# Altium PCB AcapulcoPCB.PcbDoc
Units mm, origin at the board's own origin, x right, y up, seen from the top; angles counter-clockwise.
Board outline 51.7 x 26.9 mm, 2 copper layers (Top Layer, Bottom Layer); 12 components, 12 nets, 44 pads, 0 vias.
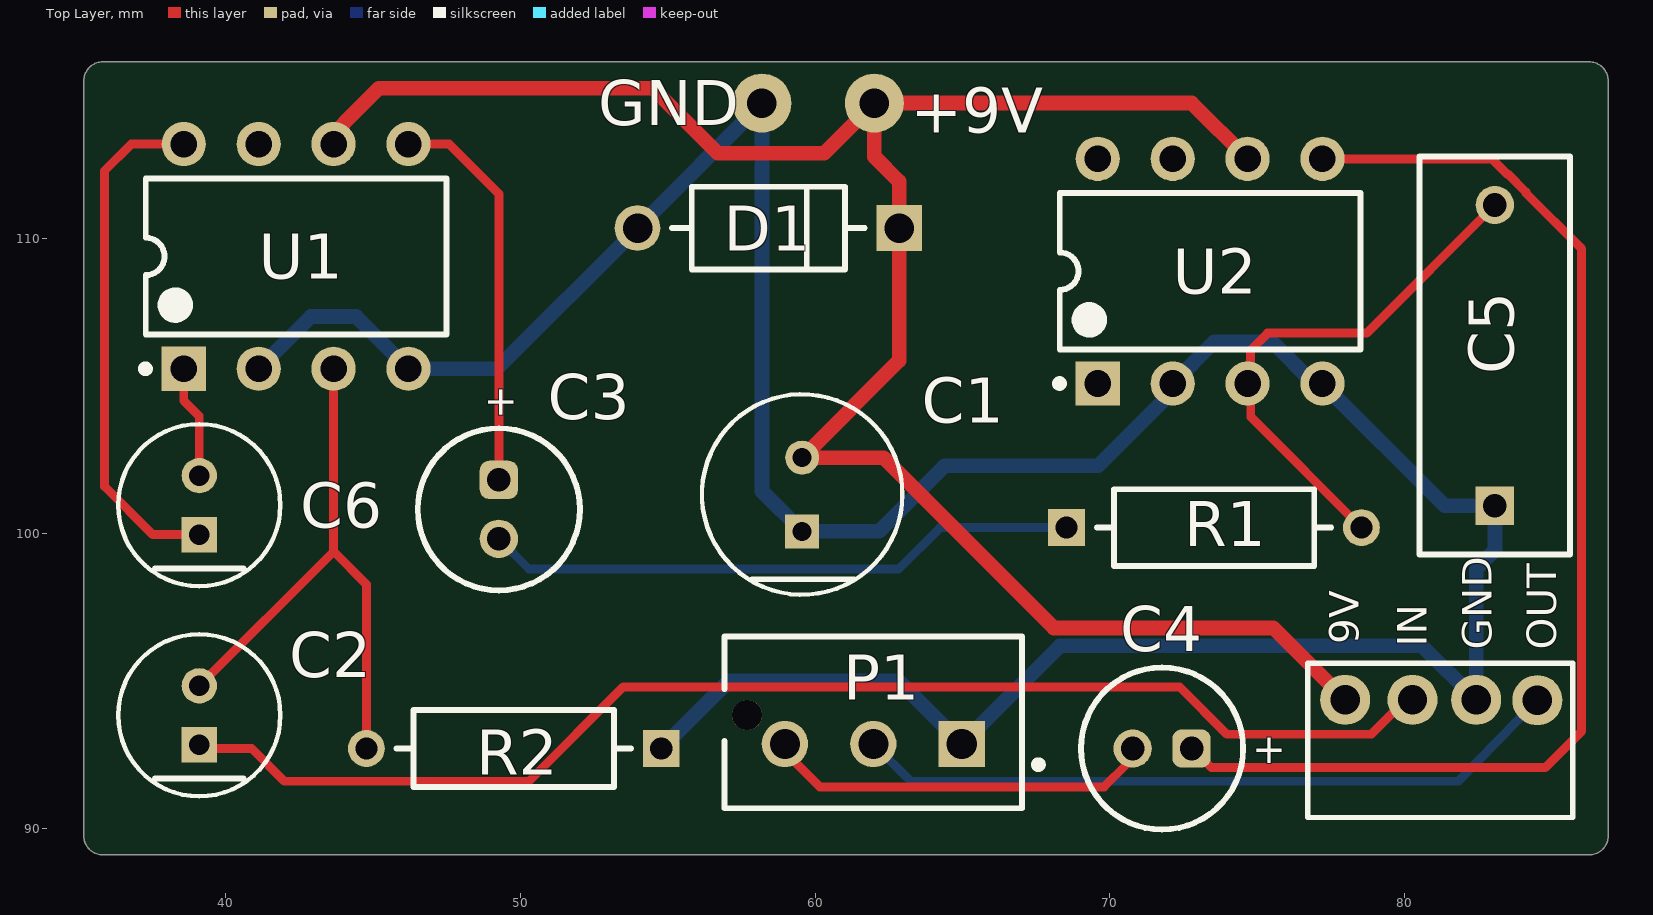
[diagram p0: Top Layer view]
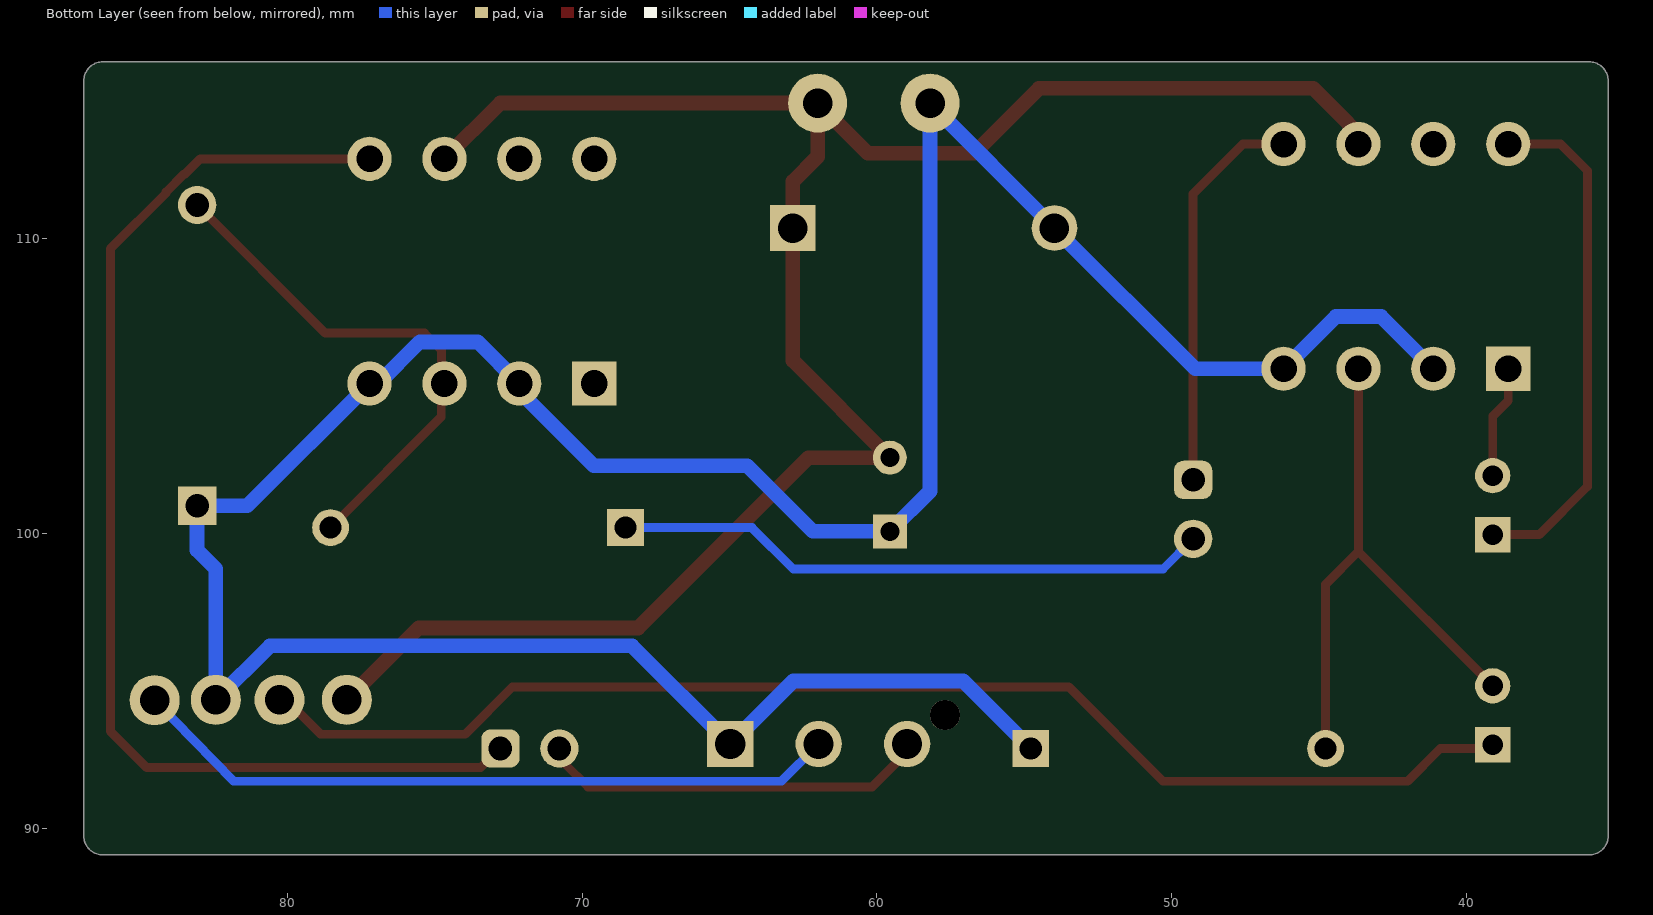
[diagram p1: Bottom Layer view, seen from below]

## Layer stack, top to bottom
Top Solder: solder mask 0.0102, Solder Resist, Dk 3.5
Top Layer: signal copper 0.0356
Dielectric 1: dielectric 0.32, FR-4, Dk 4.5
Bottom Layer: signal copper 0.0356
Bottom Solder: solder mask 0.0102, Solder Resist, Dk 3.5

## Board outline
35.845,89.1 cw(c35.845,89.745) 35.2,89.745 35.2,115.355 cw(c35.845,115.355) 35.845,116 86.255,116 cw(c86.255,115.355) 86.9,115.355 86.9,89.745 cw(c86.255,89.745) 86.255,89.1 83.6,89.1

## Design rules (kind name [scope] priority, off if disabled: settings)
Clearance [All] p1: gap=0.127 ignorepadtopadclearanceinfootprint=FALSE
MinimumSolderMaskSliver [All] p1: minsoldermaskwidth=0.12
PolygonConnect [All] p1: connectstyle=Relief reliefconductorwidth=0.254 reliefentries=4 polygonreliefangle="90 Angle" airgapwidth=0.254
RoutingVias [All] p1: holewidth=0.711 width=1.27 viastyle="Through Hole" minholewidth=0.3 minwidth=0.6 maxholewidth=1 maxwidth=2
SilkToSilkClearance [All] p1: silktosilkclearance=0.13
SolderMaskExpansion [All] p1: expansion=0 istentingtop=FALSE
SupplyNets "Schematic Supply Nets_1" [InNet('GND')] p1: voltage=0.000
SupplyNets "Schematic Supply Nets" [InNet('+9V')] p2: voltage=0.000
Width [All] p1: maxlimit=0.5 minlimit=0.3 preferedwidth=0.3
28 further rules are at their usual default settings.

## Components (designator, comment, footprint, x,y, rotation, side; value= is the part's Value field where it differs from the comment)
C1 "100uF" FP-RAD-TH-D_6_3_0_5-L_7_1-MFG 59.563,101.326 r90 top
C2 "10uF" FP-RAD-TH-D_5_0_5-L_11_1-MFG 39.116,93.837 r90 top
C3 "1uF" WCAP-ATG5_D5H11 -1220.724,1370.822 r90 top
C4 "1uF" WCAP-ATG5_D5H11 1341.771,1362.71 r0 top
C5 "4.7nF" FP-PME271Y447MR30-MFG 83.058,106.045 r90 top
C6 "10uF" FP-RAD-TH-D_5_0_5-L_11_1-MFG 39.116,100.965 r90 top
D1 "1N4007" FP-1N4007-MFG 58.42,110.363 r180 top value=15pF
P1 "100 kΩ logarithmic" FP-216571-3003-MFG 61.976,93.599 r0 top
R1 "68k" FP-CFR-25-MFG 73.533,100.203 r0 top
R2 "1M" FP-CFR-25-MFG 49.784,92.71 r180 top
U1 "LM386N-4/NOPB" P0008A 42.4,109.4 r90 top
U2 "LM386N-4/NOPB" P0008A 73.4,108.9 r90 top

## Footprints (in the part's own frame and the unit in brackets; to place one, negate y for a bottom-side part, rotate by r counter-clockwise, add the part's x,y. Pads: shape width x height; smd on the part's side, far side on the other; paste and mask are expansions set on the pad)
FP-1N4007-MFG [mm]
  rect 1.55x1.55 hole 1 paste-2539.97 mask+0: 1(-4.44,0)
  round 1.55 hole 1 paste-2539.97 mask+0: 2(4.44,0)
  silkscreen extent -3.27,-1.4 3.27,1.4, body extent -5.32,-1.5 5.32,1.5, height 0.25
FP-216571-3003-MFG [mm]
  rect 1.57x1.57 hole 1.02 paste-2539.97 mask+0: 1(3,-0.735)
  round 1.57 hole 1.02 paste-2539.97 mask+0: 2(0,-0.735) 3(-3,-0.735)
  round 1.02 hole 1.02 unplated paste-2539.97 mask+0: ""(-4.28,0.245)
  silkscreen extent -5.05,-2.92 5.72,2.92, body extent -5.15,-3.02 5.15,3.02, height 0.25
FP-CFR-25-MFG [mm]
  rect 1.25x1.25 hole 0.75 paste-2539.97 mask+0: 1(-5,0)
  round 1.25 hole 0.75 paste-2539.97 mask+0: 2(5,0)
  silkscreen extent -3.97,-1.3 3.97,1.3, body extent -5.72,-1.4 5.72,1.4, height 0.25
FP-PME271Y447MR30-MFG [mm]
  rect 1.3x1.3 hole 0.8 paste-2539.97 mask+0: 1(-5.1,0)
  round 1.3 hole 0.8 paste-2539.97 mask+0: 2(5.1,0)
  silkscreen extent -6.75,-2.55 6.75,2.55, body extent -6.85,-2.65 6.85,2.65, height 0.25
FP-RAD-TH-D_5_0_5-L_11_1-MFG [mm]
  rect 1.2x1.2 hole 0.7 paste-2539.97 mask+0: 1(-1,0)
  round 1.2 hole 0.7 paste-2539.97 mask+0: 2(1,0)
  silkscreen extent -2.75,-2.75 2.75,2.75, body extent -2.85,-2.85 2.85,2.85, height 0.25
FP-RAD-TH-D_6_3_0_5-L_7_1-MFG [mm]
  rect 1.15x1.15 hole 0.65 paste-2539.97 mask+0: 1(-1.25,0)
  round 1.15 hole 0.65 paste-2539.97 mask+0: 2(1.25,0)
  silkscreen extent -3.4,-3.4 3.4,3.4, body extent -3.5,-3.5 3.5,3.5, height 0.25
P0008A [mm] "DIP, 8-Leads, Body 10.15x6.6mm, Pitch 2.54mm"
  rect 1.5x1.5 hole 0.9: 1(-3.81,3.81)
  round 1.5 hole 0.9: 2(-3.81,1.27) 3(-3.81,-1.27) 4(-3.81,-3.81) 5(3.81,-3.81) 6(3.81,-1.27) 7(3.81,1.27) 8(3.81,3.81)
  silkscreen extent -3.93,-5.1 2.65,5.23, body extent -3.95,-5.07 3.95,5.07, height 5.08
WCAP-ATG5_D5H11 [mm] "Aluminum Electrolytic Capacitors, 5x11mm"
  rrect50% 1.3x1.3 hole 0.8: 1(-1269,-1270)
  round 1.3 hole 0.8: 2(-1271,-1270)
  silkscreen extent -1272.75,-1272.75 -1267.25,-1267.25, body extent -1272.49,-1272.5 -1267.5,-1267.5, height 11.31

## Part data
C1: library part CMP-05427-001316-1, "Aluminum Electrolytic Capacitors (Radial Lead Type) 100uF ±20% 16V", Case/Package=Radial, Max Operating Temperature=85°C, Min Operating Temperature=-40°C, Package Quantity=2000, Ripple Current=91mA, Tolerance=20%, Voltage=16V, Capacitance=100uF, Diameter=6.3mm, Height=7mm, Height - Seated (Max)=0.315inch, Lead Diameter=0.45mm, Lead Pitch=2.5mm, Length=7mm, Life (Hours)=1000Hour, Mount="Through Hole", Packaging="Tape and Reel", Polarity=Polar, Radiation Hardening=No, RoHS Compliant=Yes, Series=KA, Termination=Radial, Voltage Rating=16V, Voltage Rating (DC)=16V
C2 C6: library part CMP-05427-000651-1, "Aluminum Electrolytic Capacitors (Radial Lead Type) 10uF ±20% 50V", Case/Package=Radial, Max Operating Temperature=105°C, Package Quantity=2000, Ripple Current=250mA, Tolerance=20%, Voltage Rating (DC)=50V, Capacitance=10uF, Diameter=5mm, Dissipation Factor=0.1%, Lead Pitch=2mm, Lead/Base Style=Straight, Length=11mm, Life (Hours)=5000Hour, RoHS Compliant=Yes, Series=FR, Termination=Radial
C3 C4: library part CMP-03913-53914248-2, "Alum. Electrolytic Cap 1UF 63V 5MM Radial WCAP-ATG5 Series Lifetime 2000H +105OC", Capacitance=1µF, Case/Package=Radial, Leakage Current=3µA, Max Operating Temperature=105°C, Min Operating Temperature=-40°C, Ripple Current=13mA, Tolerance=20%, Voltage Rating=63V, Diameter=5mm, Height=11mm, Height - Seated (Max)=12.4968mm, Lead Pitch=2.0066mm, Length=11mm, Life (Hours)=2000hours, Material=Aluminium, Mount="Through Hole", Packaging="Tape & Box (TB)", Pitch=2mm, Polarity=Polar, REACH SVHC=Unknown, RoHS=Compliant, Voltage Rating (DC)=63V
C5: library part CMP-03022-000022-1, "CAP FILM 4700PF 20% 1KVDC RADIAL", Case/Package=Radial, Dielectric Material=Paper, Insulation Resistance=12GR, Max Operating Temperature=100°C, Min Operating Temperature=-40°C, Package Quantity=800, Tolerance=20%, Voltage=250V, Voltage Rating=300V, Voltage Rating (DC)=1kV, Capacitance=4.7nF, Construction=RADIAL, Depth=5.1mm, Height=10.5mm, Height - Seated (Max)=0.413inch, Lead Diameter=0.6mm, Lead Length=30mm, Lead Pitch=10.2mm, Lead/Base Style=Straight, Length=13.5mm, Mount="Through Hole", Number of Pins=2, Packaging=Bulk, Radiation Hardening=No, RoHS Compliant=Yes, Series=PME271Y, Termination=Radial, Voltage Rating (AC)=250V, Weight=0.042329oz, Width=5.1mm
D1: library part CMP-123542-000001-1, "Rectifier diode 1000 V 1 A DO-41, ,", Capacitance=15pF, Forward Current=1A, Manufacturer=Diotec, Max Junction Temp=+175°C, Max Repetitive Reverse Voltage=1000V, Max Surge Forward Current=27A, Peak Reverse Current=5uA, Temperature="-50°C to +175°C", Temperature Range Low=-50°C, Automotive=No, Category=Diode, ComponentLink2Description=Datasheet, ComponentLink2URL=https://datasheet.octopart.com/1N4007-Diotec-datasheet-62346875.pdf, Device Class L1="Discrete Semiconductors", Device Class L2=Diodes, Device Class L3="Rectifier Diodes", Height=2.8mm, Ipc Land Pattern Name=DIOAD888W100L520D280, Lead Free=Yes, Manufacturer Part Number=1N4007, Octopart=https://octopart.com/1n4007-diotec-4040411, Package=1N4007, Reverse Voltage=1000V, RoHS=TRUE, Temperature Range High=+175°C
P1: library part CMP-04776-000396-1, "MICRO-FIT PLUS SR VT HDR ASSY 30"
R1 R2: library part CMP-03413-000009-1, "RES 10 OHM 1/4W 5% AXIAL", Case/Package=Axial, Max Operating Temperature=155°C, Max Power Dissipation=250mW, Min Operating Temperature=-55°C, Package Quantity=200, Resistance=10R, Resistor Type="Carbon Film", Temperature Coefficient=500ppm/°C, Tolerance=5%, Length=0.248inch, Number of Terminations=2, Packaging=Bulk, RoHS Compliant=Yes, Series="Carbon Film"
U1 U2: library part CMP-0057-00047-4, "Low Voltage Audio Power Amplifier, 8-pin MDIP, Pb-Free", Manufacturer="Texas Instruments", PackageTopMarking=NSUZXYTTE#*LM*386N-4, PowerWise=N, Code_JEDEC=MS-001-BA, ComponentLink1Description="Datasheet URL", ComponentLink1URL=http://www.ti.com/general/docs/lit/getliterature.tsp?genericPartNumber=LM386&fileType=pdf, CompType="Audio IC", PackageDescription="MDIP, .365 x .250 x .130in, 8 Lead, .100in Pitch", PackageReference=P0008A, PinCount=8, RoHS=Y

## Free pads (board coordinates)
  round 1.7 hole 1: 4(77.978,94.361) 5(80.264,94.361) 6(82.423,94.361) 7(84.5,94.35)
  round 2 hole 1: 8(58.2,114.6) 9(62.01,114.6)

## Nets (pads, with @x,y where several pads share a name; then routed paths per layer and width w, separated by ;. In a path a pad name is that pad's centre, name@x,y a point inside that pad or via, vN(x,y) a via of type N, cw(c..) or ccw(c..) an arc to the next point about the centre after c; other vN are vias at no path point)
+9V: C1.2 D1.1 pad.4 pad.9 U1.6 U2.6 | length 70
  Top Layer w0.5: U1.6 43.67,113.547 44.036,113.913 44.036,113.936 45.2,115.1 54.5,115.1 56.7,112.9 60.31,112.9 pad.9 ; U2.6 72.78,114.6 pad.9 ; pad.4 75.539,96.8 68.1,96.8 62.324,102.576 C1.2 62.86,105.873 D1.1 62.86,111.94 62.01,112.79 pad.9
GND: C1.1 C5.1 D1.2 P1.1 pad.6 pad.8 R2.1 U1.2 U1.4 U2.2 U2.4 | length 104.4
  Bottom Layer w0.5: U1.2 42.9,107.36 44.44,107.36 U1.4 49.207,105.59 D1.2 53.98,110.372 pad.8@58.2,114.592 ; R2.1 57.074,95 62.84,95 P1.1 68.312,96.2 80.584,96.2 pad.6 82.423,98.803 83.058,99.438 C5.1 81.355,100.945 U2.4 76.91,105.09 75.5,106.5 73.54,106.5 U2.2 72.13,104.83 69.6,102.3 64.4,102.3 62.176,100.076 C1.1 58.2,101.439 pad.8@58.2,114.592 ; pad.8 pad.8@58.2,114.592
IN: C2.1 pad.5 | length 44.1
  Top Layer w0.3: C2.1 39.243,92.71 40.89,92.71 42,91.6 50.3,91.6 53.5,94.8 72.362,94.8 73.967,93.195 78.871,93.195 80.037,94.361 pad.5
NetC2_2: C2.2 R2.2 U1.3 | length 19.8
  Top Layer w0.3: C2.2 43.67,99.391 ; U1.3 43.67,99.391 ; R2.2 44.784,98.277 43.67,99.391
NetC3_1: C3.1 U1.5 | length 13.5
  Top Layer w0.3: U1.5 47.59,113.21 49.276,111.524 C3.1
NetC3_2: C3.2 R1.1 | length 20.3
  Bottom Layer w0.3: C3.2 50.298,98.8 62.837,98.8 64.24,100.203 R1.1
NetC4_1: C4.1 U2.5 | length 40.4
  Top Layer w0.3: C4.1 72.798,92.71 73.447,92.061 84.761,92.061 86,93.3 86,109.661 84.112,111.549 84.112,111.582 83.495,112.199 83.462,112.199 82.951,112.71 U2.5
NetC4_2: C4.2 P1.3 | length 13.3
  Top Layer w0.3: P1.3 58.976,92.597 60.165,91.408 69.802,91.408 70.58,92.186 70.58,92.519 C4.2
NetC5_2: C5.2 R1.2 U2.3 | length 18
  Top Layer w0.3: R1.2 74.777,103.959 74.777,104.983 U2.3 74.77,105.19 74.77,106.221 75.349,106.8 78.713,106.8 C5.2
NetC6_1: C6.1 U1.8 | length 17.7
  Top Layer w0.3: U1.8 36.81,113.21 35.9,112.3 35.9,101.6 37.535,99.965 C6.1
NetC6_2: C6.2 U1.1 | length 3.8
  Top Layer w0.3: U1.1 38.59,104.51 39.116,103.984 C6.2
OUT: P1.2 pad.7 | length 24.2
  Bottom Layer w0.3: P1.2 63.24,91.6 81.821,91.6 pad.7
pads on no net: P1. U1.7 U2.1 U2.7 U2.8

## Silkscreen, mask and mechanical layers (free items; w line width, h text height)
Top Overlay:
  lines w0.178: 76.708,90.37 85.7,90.37 85.7,95.6 76.708,95.6 76.708,90.37
  text "GND" at 52.654,113.854 h1.52
  text "+9V" at 63.25,113.6 h1.52
  text "9V" at 78.446,96.254 h1 r90
  text "IN" at 80.746,96.154 h1 r90
  text "GND" at 82.946,96.054 h1 r90
  text "OUT" at 85.146,96.054 h1 r90

## Text inside footprints (layer, text, board x,y; h text height)
C3: Top Overlay "+" at 49.776,103.872 h1 r90
C4: Top Overlay "+" at 74.821,92.21 h1